# Altium PCB PCB.PcbDoc
Units mm, origin at the board's own origin, x right, y up, seen from the top; angles counter-clockwise.
Board outline 92.3 x 87.6 mm, 2 copper layers (Top Layer, Bottom Layer); 48 components, 51 nets, 200 pads, 325 vias.
Unrouted connection lines stored in the file: 1.
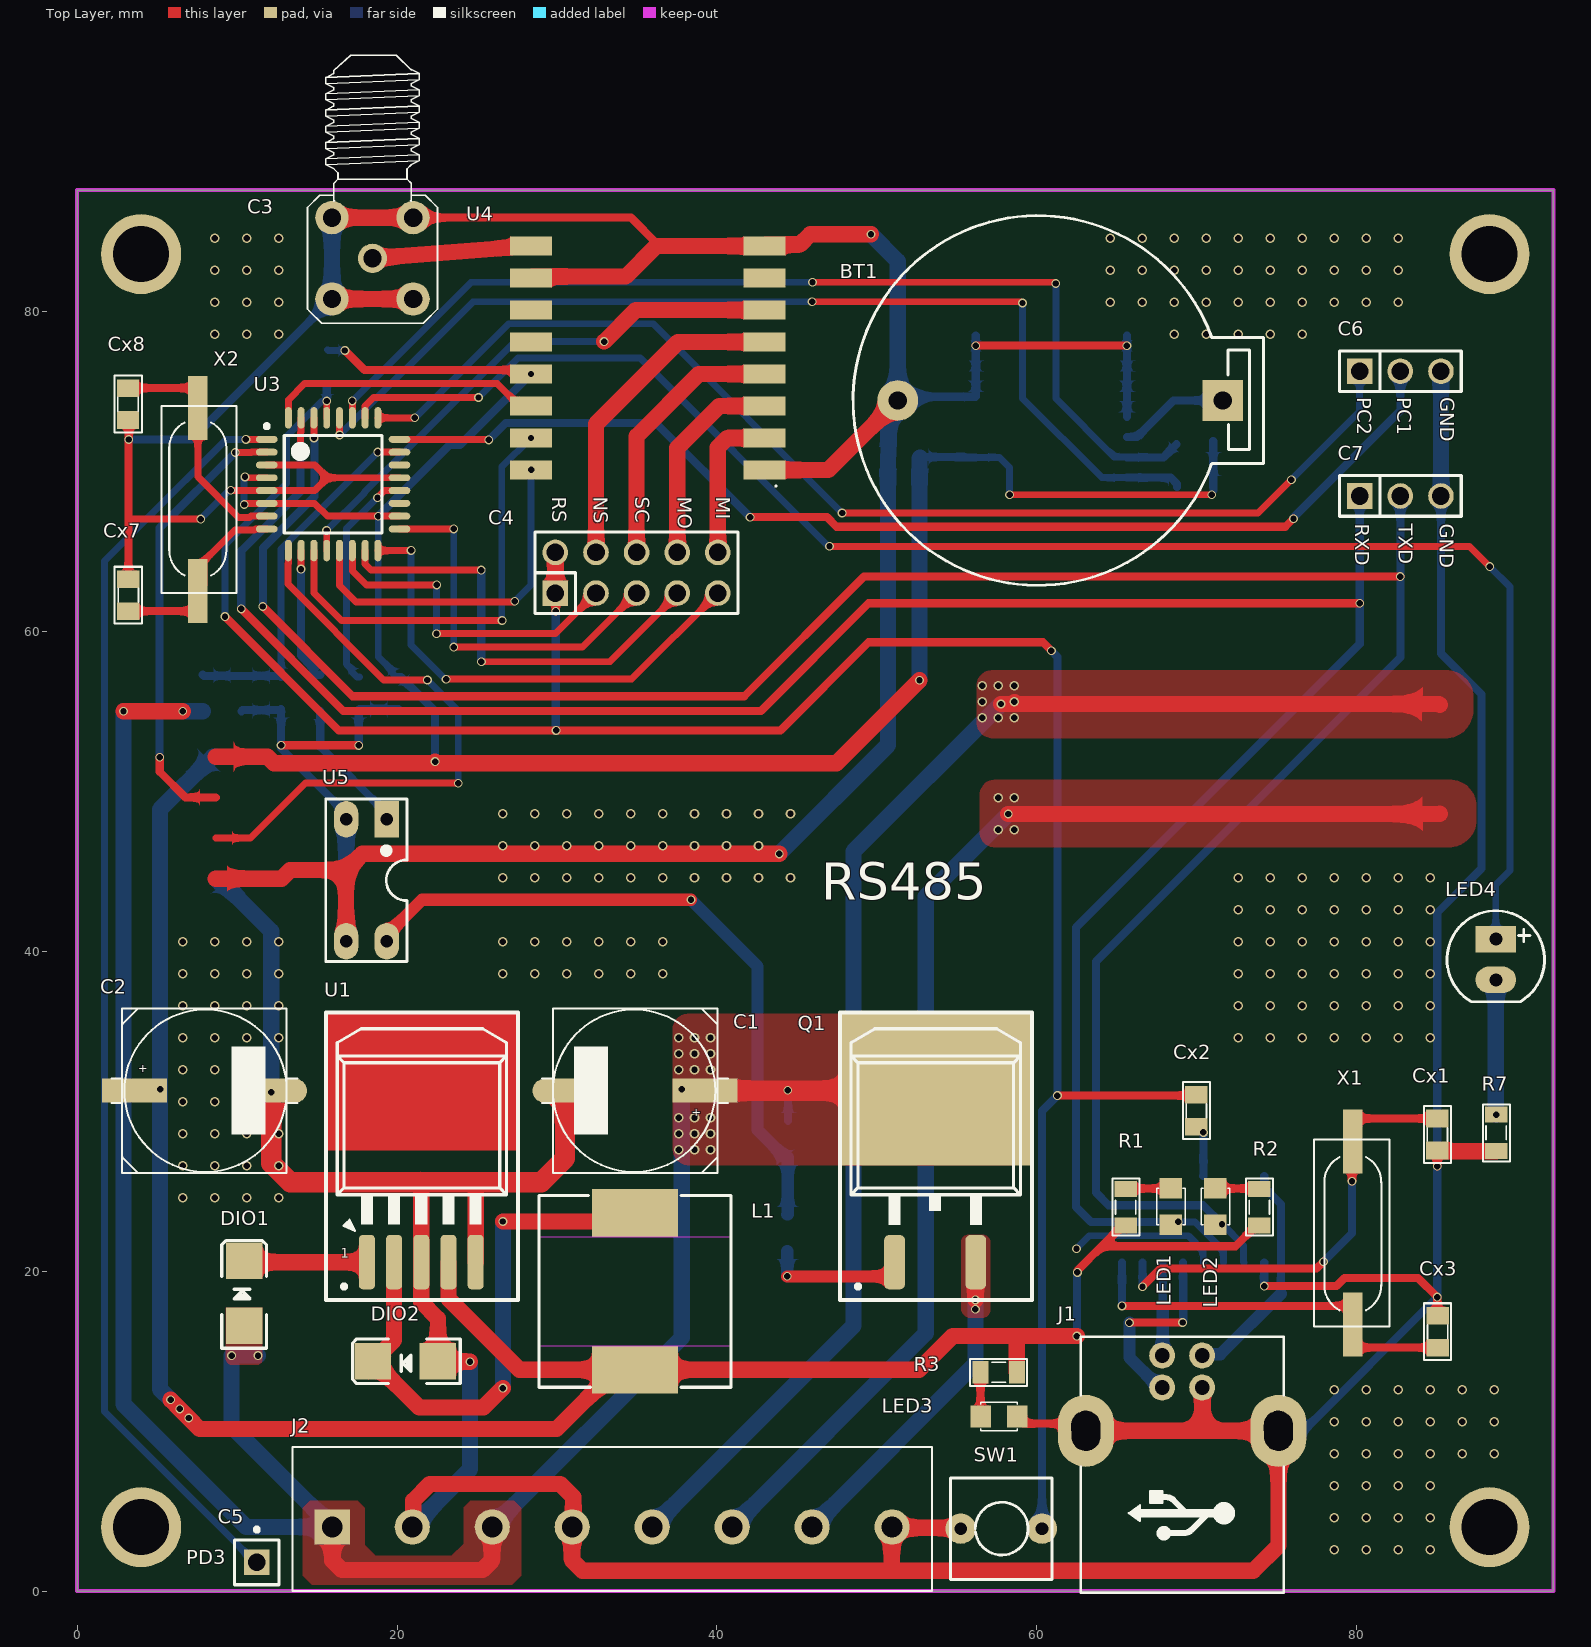
[diagram p0: Top Layer view]
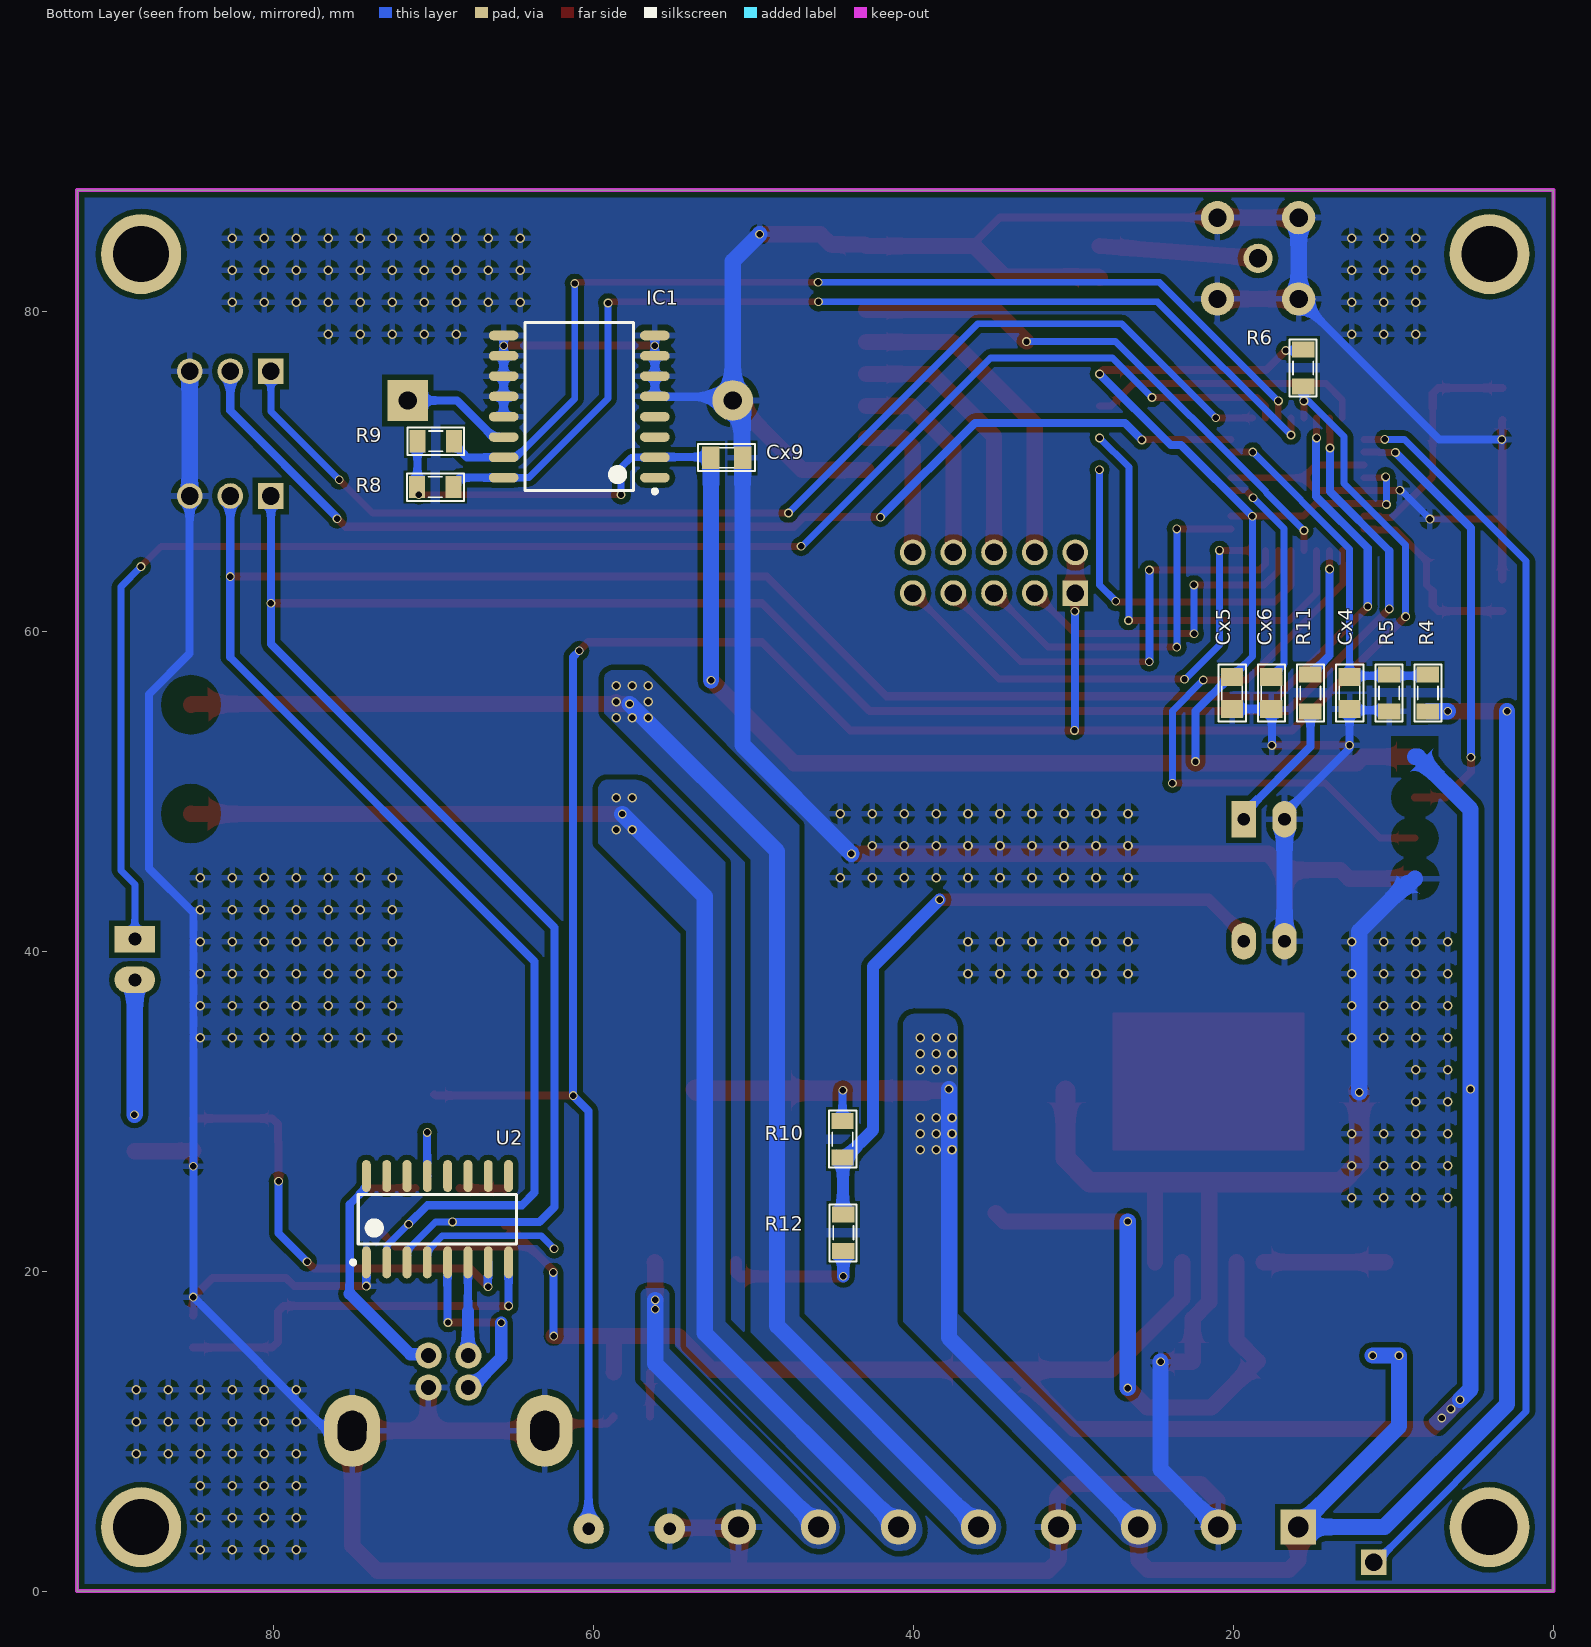
[diagram p1: Bottom Layer view, seen from below]

## Layer stack, top to bottom
Top Solder: solder mask 0.0102, Solder Resist, Dk 3.5
Top Layer: signal copper 0.0356
Dielectric 1: dielectric 0.32, FR-4, Dk 4.8
Bottom Layer: signal copper 0.0356
Bottom Solder: solder mask 0.0102, Solder Resist, Dk 3.5

## Board outline
0,0 92.3,0 92.3,87.6 0,87.6

## Design rules (kind name [scope] priority, off if disabled: settings)
Clearance [All] p1: gap=0.33 ignorepadtopadclearanceinfootprint=FALSE
PolygonConnect PolygonConnect_1 [InNet('GND')] p1: connectstyle=Relief reliefconductorwidth=0.381 reliefentries=4 polygonreliefangle="90 Angle" airgapwidth=0.381
PolygonConnect [All] p2: connectstyle=Direct reliefconductorwidth=0.381 reliefentries=4 polygonreliefangle="90 Angle" airgapwidth=0.381
RoutingVias [All] p1: holewidth=0.4 width=0.55 viastyle="Through Hole" minholewidth=0.4 minwidth=0.55 maxholewidth=0.4 maxwidth=0.55
SolderMaskExpansion [All] p1: expansion=0.102 istentingtop=FALSE
Width [All] p1: maxlimit=1.016 minlimit=0.432 preferedwidth=0.508
30 further rules are at their usual default settings.

## Components (designator, comment, footprint, x,y, rotation, side; value= is the part's Value field where it differs from the comment)
BT1 "PIN 3V" PIN3V 71.628,74.447 r180 top
C1 "CN-ALU-SMD" CAP-ALU-SMD-G 34.823,31.293 r180 top
C2 "CN-ALU-SMD" CAP-ALU-SMD-G 8.026,31.293 r0 top
C3 "210111003" SMA-RA 18.466,83.337 r180 top
C4 "JP5x2" JP5-D2T 34.976,63.678 r0 top
C5 "JP1" JP1-D1T 11.227,1.803 r0 top
C6 "JP3" JP3-D1T 80.188,76.276 r0 top
C7 "JP3" JP3-D1T 80.188,68.478 r0 top
Cx1 "XXpF" CN-SMD-0805 85.039,28.556 r90 top value=33pF
Cx2 "XXpF" CN-SMD-0805 69.977,30.048 r90 top value=33pF
Cx3 "XXpF" CN-SMD-0805 85.065,16.226 r270 top value=33pF
Cx4 "XXpF" CN-SMD-0805 12.746,56.159 r90 bottom value=33pF
Cx5 "XXpF" CN-SMD-0805 20.091,56.159 r90 bottom value=33pF
Cx6 "XXpF" CN-SMD-0805 17.643,56.159 r90 bottom value=33pF
Cx7 "XXpF" CN-SMD-0805 3.201,62.275 r270 top value=33pF
Cx8 "XXpF" CN-SMD-0805 3.175,74.225 r90 top value=33pF
Cx9 "XXpF" CN-SMD-0805 51.698,70.866 r0 bottom value=33pF
DIO1 "Diode SMD" DIO-SMD-106 10.439,18.618 r270 top value=1N5007
DIO2 "Diode SMD" DIO-SMD-106 20.523,14.376 r0 top value=1N5007
IC1 "DS3231" DS3231 60.909,74.066 r0 bottom
J1 "8492121" USB-C2 68.834,9.296 r180 top
J2 "KF8" KF8-5 33.452,4.013 r0 top
L1 "1.0 μH" L-SMD-M-12x10 34.874,18.745 r0 top
LED1 "LED" LED-0805-Orange 68.381,25.197 r270 top value="LED 3 - 5 ly 2 Colour"
LED2 "LED" LED-0805-Green 71.167,25.197 r270 top value="LED 3 - 5 ly 2 Colour"
LED3 "LED" LED-0805-Green 56.49,10.922 r0 top value="LED 3 - 5 ly 2 Colour"
LED4 "LED" LED-5-Yellow 88.697,40.767 r270 top value="LED 3 ly Single Colour"
Q1 "IRF5305" IRF5305 53.645,20.574 r0 top
R1 "Res" RES-SMD-0805 65.557,24.016 r90 top
R2 "Res" RES-SMD-0805 73.914,24.016 r90 top
R3 "Res" RES-SMD-0805 57.607,13.691 r0 top
R4 "Res" RES-SMD-0805 7.849,56.159 r90 bottom
R5 "Res" RES-SMD-0805 10.272,56.159 r270 bottom
R6 "Res" RES-SMD-0805 15.646,76.479 r270 bottom
R7 "Res" RES-SMD-0805 88.722,28.651 r90 top
R8 "Res" RES-SMD-0805 69.901,69.037 r180 bottom
R9 "Res" RES-SMD-0805 69.88,71.907 r180 bottom
R10 "Res" RES-SMD-0805 44.45,28.27 r90 bottom
R11 "Res" RES-SMD-0805 15.194,56.159 r90 bottom
R12 "Res" RES-SMD-0805 44.399,22.403 r270 bottom
SW1 "RST" SW2 60.325,3.912 r180 top value="SW chip 2 pin"
U1 "LM2976" TO263 21.133,26.543 r0 top
U2 "CH340G" SO16 69.774,23.259 r90 bottom
U3 "ATmega328-AU" TQFP32 16.002,69.215 r0 top
U4 "SW96" RFM96 44.435,85.36 r180 top
U5 "PC817" DIP4 19.355,48.26 r180 top
X1 "20Mhz" XTAL-RU49/4 79.756,17.438 r90 top value=4Mhz
X2 "20Mhz" XTAL-RU49/4 7.544,73.203 r270 top value=4Mhz

## Footprints (in the part's own frame and the unit in brackets; to place one, negate y for a bottom-side part, rotate by r counter-clockwise, add the part's x,y. Pads: shape width x height; smd on the part's side, far side on the other; paste and mask are expansions set on the pad)
CAP-ALU-SMD-G [mil]
  rect 160x59.06 smd: 1(-175,0)
  oval 160x59.06 smd: 2(170,0)
  silkscreen extent -231,-203 226,203, body extent -233,-203 223,203, height 402
CN-SMD-0805 [mm]
  rect 1.1x1.397 smd: 1(-1,0) 2(1,0)
  silkscreen extent -1.78,-0.86 1.78,0.84, body extent -1,-0.62 1,0.63, height 0.8
DIO-SMD-106 [mil]
  rect 90x90.55 smd: 1(80,0) 2(-80,0)
  silkscreen extent -130,-55 135,55, body extent -99,-50 106,52, height 95
DIP4 [mil]
  rect 60x90 hole 31: 1(0,0)
  oval 60x90 hole 31: 2(100,0) 3(100,300) 4(0,300)
  silkscreen extent -50,-50 150,350, body extent -59,-10 159,305, height 170
DS3231 [mm]
  oval 1.85x0.6 smd: 1(-4.725,4.445) 2(-4.725,3.175) 3(-4.725,1.905) 4(-4.725,0.635) 5(-4.725,-0.635) 6(-4.725,-1.905) 7(-4.725,-3.175) 8(-4.725,-4.445) 9(4.725,-4.445) 10(4.725,-3.175) 11(4.725,-1.905) 12(4.725,-0.635) 13(4.725,0.635) 14(4.725,1.905) 15(4.725,3.175) 16(4.725,4.445)
  silkscreen extent -4.85,-5.25 3.4,5.42, body extent -5.17,-5.25 5.17,5.25, height 2.5
IRF5305 [mm]
  rrect50% 1.3x3.4 smd: 1(-2.54,0) 2(2.54,0)
  rect 12x9.5 smd: 3(0,10.795)
  silkscreen extent -5.95,-2.38 6.05,15.62, body extent -5,-0.94 5,14.73, height 4.88
JP1-D1T [mm] "1pins, 1 row, straight, gold plating"
  rect 1.6x1.6 hole 1.1: 1(0,0)
  silkscreen extent -1.4,-1.4 1.4,2.17, body extent -1.27,-1.27 1.27,1.27, height 8.54
JP3-D1T [mm] "3 pins, 1 row, straight, gold plating"
  rect 1.6x1.6 hole 1.1: 1(0,0)
  round 1.6 hole 1.1: 2(2.54,0) 3(5.08,0)
  silkscreen extent -1.27,-1.27 6.35,1.27, body extent -1.27,-1.27 6.35,1.27, height 8.54
JP5-D2T [mm] "10 pins, dual pin, straight, gold plating"
  rect 1.6x1.6 hole 1.1: 1(-5.08,-1.27)
  round 1.6 hole 1.1: 2(-2.54,-1.27) 3(0,-1.27) 4(2.54,-1.27) 5(5.08,-1.27) 6(5.08,1.27) 7(2.54,1.27) 8(0,1.27) 9(-2.54,1.27) 10(-5.08,1.27)
  silkscreen extent -6.35,-2.54 6.35,2.54, body extent -6.35,-2.54 6.35,2.54, height 8.55
KF8-5 [mm] "Serie 1337 - 5.00 mm_8 pins"
  rect 2.2x2.2 hole 1.3: 1(-17.5,0)
  round 2.2 hole 1.3: 2(-12.5,0) 3(-7.5,0) 4(-2.5,0) 5(2.5,0) 6(7.5,0) 7(12.5,0) 8(17.5,0)
  silkscreen extent -20,-4 20,5, body extent -20,-4 20,5, height 13
L-SMD-M-12x10 [mm] "WE-PDA SMD Shielded Power Inductor, 1210"
  rect 5.4x3 smd: 1(0,4.9) 2(0,-4.9)
  Top Layer keep-out region: -6,-3.4 6,-3.4 6,3.4 -6,3.4
  silkscreen extent -6,-6 6,6, body extent -6,-6 6,6, height 9.7
LED-5-Yellow [mil] "LED 2 PIN, 5 ly , Only colour,pin to pin 100mil"
  rect 65x100 hole 32: 1(0,0)
  oval 65x100 hole 32: 2(100,0)
  silkscreen extent -70,-120 154,120, body extent -67,-122 147,115, height 339
LED-0805-Green [mil]
  rect 50x55 smd: 1(0,0) 2(90,0)
  silkscreen extent 0,-35 90,35, body extent 5,-25 85,25, height 43
LED-0805-Orange [mil]
  rect 50x55 smd: 1(0,0) 2(90,0)
  silkscreen extent 0,-35 90,35, body extent 5,-25 85,25, height 43
PIN3V [mil]
  rect 100x100 hole 45: 1(0,0)
  round 100 hole 45: 2(800,0)
  silkscreen extent -100,-455 910,455, body extent -128,-447 1002,449, height 278
RES-SMD-0805 [mil]
  rect 39.37x55 smd: 1(-45,0) 2(45,0)
  silkscreen extent -70,-34 70,33, body extent -39,-25 39,25, height 31
RFM96 [mm] "U?"
  rect 2.6x1.2 smd: 1(1.463,15.255) 2(1.463,13.255) 3(1.463,11.255) 4(1.463,9.255) 5(1.463,7.255) 6(1.463,5.255) 7(1.463,3.255) 8(1.463,1.255) 9(16.063,1.255) 10(16.063,3.255) 11(16.063,5.255) 12(16.063,7.255) 13(16.063,9.255) 14(16.063,11.255) 15(16.063,13.255) 16(16.063,15.255)
  silkscreen extent 0.7,16.22 0.8,16.32, body extent 0.76,0.31 16.76,16.21, height 2.19
SMA-RA [mil]
  round 72 hole 45: 1(0,0)
  round 82 hole 45: 2(-100,-100) 3(100,-100) 4(100,100) 5(-100,100)
  silkscreen extent -160,-500 160,160, body extent -137,-457 139,137, height 394
SO16 [mm] "SOIC, 16-Leads, Body 9.90x3.91mm, Pitch 1.27mm, IPC Medium Density"
  oval 2x0.55 smd: 1(-2.7,4.445) 2(-2.7,3.175) 3(-2.7,1.905) 4(-2.7,0.635) 5(-2.7,-0.635) 6(-2.7,-1.905) 7(-2.7,-3.175) 8(-2.7,-4.445) 9(2.7,-4.445) 10(2.7,-3.175) 11(2.7,-1.905) 12(2.7,-0.635) 13(2.7,0.635) 14(2.7,1.905) 15(2.7,3.175) 16(2.7,4.445)
  silkscreen extent -2.82,-4.95 1.55,5.4, body extent -3,-4.95 3,4.95, height 1.4
SW2 [mil]
  round 75 hole 31: 1(0,0) 2(200,0)
  silkscreen extent -25,-125 225,125
TO263 [mm]
  rrect50% 1x3.4 smd: 1(-3.019,-5.969) 2(-1.319,-5.969) 4(2.081,-5.969) 5(3.781,-5.969)
  rrect50% 1x3.4 smd mask+0: 3(0.381,-5.969)
  Top Layer region: -5.568,1.016 6.432,1.016 6.432,9.65 -5.568,9.65
  silkscreen extent -5.57,-8.35 6.43,9.65, body extent -4.73,-6.84 5.43,7.8, height 4.57
TQFP32 [mm] "Thin QFP, 32-Leads, Body 9x9mm, Pitch 0.8mm, IPC Low Density"
  oval 1.35x0.432 smd: 1(-4.15,2.8) 2(-4.15,2) 3(-4.15,1.2) 4(-4.15,0.4) 5(-4.15,-0.4) 6(-4.15,-1.2) 7(-4.15,-2) 8(-4.15,-2.8) 17(4.15,-2.8) 18(4.15,-2) 19(4.15,-1.2) 20(4.15,-0.4) 21(4.15,0.4) 22(4.15,1.2) 23(4.15,2) 24(4.15,2.8)
  oval 0.432x1.35 smd: 9(-2.8,-4.15) 10(-2,-4.15) 11(-1.2,-4.15) 12(-0.4,-4.15) 13(0.4,-4.15) 14(1.2,-4.15) 15(2,-4.15) 16(2.8,-4.15) 25(2.8,4.15) 26(2,4.15) 27(1.2,4.15) 28(0.4,4.15) 29(-0.4,4.15) 30(-1.2,4.15) 31(-2,4.15) 32(-2.8,4.15)
  silkscreen extent -4.27,-3.05 3.05,3.75, body extent -4.5,-4.5 4.5,4.5, height 1.4
USB-C2 [mil]
  round 64 hole 36 mask+1: 1(-59.21,-214.16) 2(39.21,-214.16) 3(39.21,-135.42) 4(-59.21,-135.42)
  oval 137.8x177.17 hole 70.87 slot 98.43 at 91 deg mask+0: 4(-247.01,-28.72) 4(227.01,-28.72)
  silkscreen extent -260,-260 240,370, body extent -293,-242 273,376, height 453
XTAL-RU49/4 [mm]
  rect 4x1.2 smd: 1(-0.762,0) 2(10.668,0)
  silkscreen extent -0.89,-2.29 10.79,2.41, body extent -1.2,-2.22 11.1,2.48, height 4.3

## Part data
BT1: "Battery 3VDC"
C1 C2: "Polarized Capacitor (Axial)", LatestRevisionDate=17-Jul-2002, LatestRevisionNote="Re-released for DXP Platform.", PackageReference=POLAR0.8, Published=8-Jun-2000, Publisher="Altium Limited"
C3: library part "CON Ant", "CONNECTOR ANTEN", Manufacturer="Würth Elektronik eiSos GmbH", ComponentLink1Description=Manufacturer, ComponentLink1URL=http://www.we-online.de, ComponentLink2Description=Datasheet, ComponentLink2URL=http://katalog.we-online.de/kataloge/eisos/index.php?language=en&pf=Filter_gerade, Created by="Christin Zierenner", Created Date="May 2012", partNo=210111003
C4: "WR-PHD 2.54 mm Dual Socket Header", Manufacturer="W¨¹rth Elektronik eiSos GmbH", partNo=61301021821, ComponentLink1 Description=Manufacturer, ComponentLink1URL=http://www.we-online.com, ComponentLink2 Description=Datasheet, ComponentLink2URL=http://katalog.we-online.de/em/datasheet/6130xx21821.pdf, Created by="Karrer Zheng", Created Date="29 March 2013", NoPins=10
C5: "WR-PHD 2.54 mm Angled Socket Header", Manufacturer="W¨¹rth Elektronik eiSos GmbH", partNo=613002143121, ComponentLink1 Description=Manufacturer, ComponentLink1URL=http://www.we-online.com, ComponentLink2 Description=Datasheet, ComponentLink2URL=http://katalog.we-online.de/em/datasheet/6130xx143121.pdf, Created by="Karrer Zheng", Created Date="29 March 2013", NoPins=02
C6 C7: "WR-PHD 2.54 mm Angled Socket Header", Manufacturer="W¨¹rth Elektronik eiSos GmbH", partNo=613003143121, ComponentLink1 Description=Manufacturer, ComponentLink1URL=http://www.we-online.com, ComponentLink2 Description=Datasheet, ComponentLink2URL=http://katalog.we-online.de/em/datasheet/6130xx143121.pdf, Created by="Karrer Zheng", Created Date="29 March 2013", NoPins=03
Cx1 Cx2 Cx3 Cx4 Cx5 Cx6 Cx7 Cx8 Cx9: library part CN
DIO1 DIO2: "Default Diode", Code - JEDEC=DO-214-AB, Published=8-Jun-2000, Publisher="Altium Limited", Revision="July-2002: Re-released for DXP Platform."
J1: library part USB-4, "THT USB 2.0 A Connector WE-EPLE", Manufacturer="Würth Elektronik eiSos GmbH", ComponentLink1Description=Manufacturer, ComponentLink1URL=http://www.we-online.de, ComponentLink2Description=Datasheet, ComponentLink2URL=http://www.we-online.de/katalog/media/pdf/8492121.pdf, Created by="Christin Otto", Created Date=OCT-2014, partNo=8492121
J2: Manufacturer="W¨¹rth Elektronik eiSos GmbH", partNo=691133710008, ComponentLink1 Description=Manufacturer, ComponentLink1 URL=http://www.we-online.com, ComponentLink2 Description=Datasheet, ComponentLink2 URL=http://katalog.we-online.de/em/datasheet/6911337100xx.pdf, Created by="Baojun Chen", Created Date=4-Aug-15, NoPins=8
L1: library part L-SMD-1, Manufacturer="Wurth Elektronik", partNo=78477010, ComponentLink1Description=Manufacturer, ComponentLink1URL=http://www.we-online.de, ComponentLink2Description=Datasheet, ComponentLink2URL=http://katalog.we-online.de/pbs/datasheet/78477010.pdf, Created by="Baojun Chen", Created Date=Nov.2015, Inductance="1.0 μH"
LED1 LED2 LED3: library part "LED SMD"
LED4: "LED Single colour Green and Red"
R1 R2 R3 R4 R5 R6 R7 R8 R9 R10 R11 R12: library part Res-SMD, "Resistor", Manufacturer="Generic Components", Class=Passive, Published=08/06/2000, Publisher="Altium Hobart Technology Centre"
SW1: library part SW2, "Switch button 2 pin"
U1: library part LM2596, Max Input Voltage="12 V", Max Output Current="3 (6.0 peak) A", Max Output Voltage=mV, Temperature Range="-40 to +125 degC", Category=IC-Power, Min Input Voltage=mV, Min Output Voltage=mV, Mounting Technology="Surface Mount", Status=Unreleased, Supply Voltage=mV
U2: "High and Low Side Driver", ComponentLink1Description="Manufacturer Link", ComponentLink1URL=http://www.irf.com/, ComponentLink2Description=Datasheet, ComponentLink2URL=http://www.irf.com/product-info/datasheets/data/ir2110.pdf, DatasheetVersion=PD60147J, LatestRevisionDate=04-Mar-2005, LatestRevisionNote="Stylized 3D Model Added.", Note="Pins 4, 8 and 14 are not connected", PackageDescription="DIP; 14 Leads; Row Spacing 7.62 mm; Pitch 2.54 mm", PackageReference=PDIP14, Published=8-Jun-2000, Publisher="Altium Limited"
U3: "8-bit AVR Microcontroller, 32KB Flash, 1KB EEPROM, 2KB SRAM, 32-pin TQFP, Industrial Grade (-40°C to 85°C)", Supplier Part Number 1=ATMEGA328-AU-ND, Code_JEDEC=MS-026-ABA, ComponentLink1Description="Manufacturer Link", ComponentLink1URL=http://www.atmel.com/products/avr/default.asp?, ComponentLink2Description="ATmega48A/48PA/88A/88PA/168A/168PA/328/328P Datasheet", ComponentLink2URL=http://www.atmel.com/dyn/resources/prod_documents/8271.pdf, ComponentLink3Description="ATmega48A/48PA/88A/88PA/168A/168PA/328/328P Summary", ComponentLink3URL=http://www.atmel.com/dyn/resources/prod_documents/8271S.pdf, ComponentLink4Description="Atmel.com Home", ComponentLink4URL=http://www.atmel.com, DatasheetVersion="revA, Jan-2010", PackageDescription="32-Lead, 7x7x1.0 mm Body, 0.8mm Lead Pitch, Thin Profile Plastic Quad Flat Package (TQFP)", PackageReference=32A, PackageVersion="revB, Oct-2001", Published=1-Apr-2010, Publisher="Altium Limited", Supplier 1=Digi-Key, Supplier 2=Mouser, Supplier Part Number 2=556-ATMEGA328-AU
U5: "Single Opto"
X1 X2: library part XT2, "Crystal, 32.768 KHz, -40 to 85 degC, 3.2 x 1.5 x 0.9 mm SMD"

## Free pads (board coordinates)
  round 5 hole 3.5: 1(4,83.6) 2(88.3,83.6) 3(88.3,4) 4(4,4)

## Via types
v1: diameter 0.6/0.6 (per signal layer), hole 0.4, Top Layer to Bottom Layer, 192 vias
v2: diameter 0.55, hole 0.4, Top Layer to Bottom Layer, 103 vias
v3: diameter 0.6, hole 0.4, Top Layer to Bottom Layer, 30 vias

## Nets (pads, with @x,y where several pads share a name; then routed paths per layer and width w, separated by ;. In a path a pad name is that pad's centre, name@x,y a point inside that pad or via, vN(x,y) a via of type N, cw(c..) or ccw(c..) an arc to the next point about the centre after c; other vN are vias at no path point)
+3.3V: C2.1 Cx5.2 Cx9.2 IC1.2 L1.2 R1.1 R2.1 R3.2 R6.1 R8.1 R9.1 U1.4 U3.4 U3.6 U3.18 U4.13 | length 277.8
  Top Layer w0.432: v2(10.439,67.945) 10.471,67.945 10.541,68.015 14.84,68.015 15.64,67.215 v2(18.821,67.215) U3.18 ; v2(10.49,69.672) 10.522,69.672 10.579,69.615 U3.4 ; v2(58.296,68.549) 58.302,68.555 v2(70.942,68.555)
  Top Layer w0.508: v2(16.739,77.572) 17.958,76.352 28.124,76.352 v2(28.372,76.105) U4.13@28.397,76.13 ; v2(62.535,19.93) 62.535,20.049 64.051,21.565 ; R1.1 65.359,22.873 64.051,21.565 ; R2.1 73.715,22.873 73.469,22.627 73.469,22.619 72.415,21.565 64.051,21.565
  Top Layer w1.016: v2(5.842,11.963) v2(6.411,11.395) v2(6.979,10.826) 7.671,10.135 29.964,10.135 33.336,13.507 L1.2@33.336,13.845 ; 8.661,52.172 11.9,52.172 12.302,51.77 22.28,51.77 v2(22.377,51.867) ; v2@22.377,51.77 47.477,51.77 v2(52.664,56.956) ; U1.4 23.214,18.29 27.658,13.845 L1.2@33.336,13.845 ; R3.2 58.742,13.699 58.742,15.832 58.623,15.951 ; v2(62.509,15.951) 58.623,15.951 ; L1.2@33.336,13.845 L1.2 52.631,13.845 54.737,15.951 58.623,15.951
  Bottom Layer w0.432: v2(10.439,67.945) 10.439,69.589 10.49,69.64 v2(10.49,69.672) ; R6.1 15.697,77.572 v2(16.739,77.572) ; v2(18.821,67.215) 18.821,58.43 19.609,57.642 19.609,57.494 19.943,57.16 Cx5.2 ; IC1.2 57.658,70.891 58.293,70.256 58.293,68.552 v2(58.296,68.549)
  Bottom Layer w0.508: v2(18.821,67.215) 18.832,67.215 23.277,71.66 23.927,71.66 v2(28.372,76.105) ; Cx5.2 20.24,57.16 22.377,55.022 v2(22.377,51.867) ; Cx9.2 52.749,70.917 55.509,70.917 55.534,70.891 IC1.2 ; v2(62.509,15.951) 62.509,19.894 62.535,19.919 v2(62.535,19.93) ; R9.1 71.033,71.897 71.033,69.048 R8.1 R8.1@71.044,68.839
  Bottom Layer w1.016: v2(5.842,11.963) 5.182,12.624 v2(5.182,31.394) 5.182,48.882 8.471,52.172 8.661,52.172 ; v2(52.664,56.956) 52.664,70.831 Cx9.2
+12V: C1.1 DIO1.1 J2.1 J2.3 Q1.3 R4.1 R10.2 | length 146.3
  Top Layer w1.016: v2(2.896,55.016) v2(6.604,55.016) ; J2.1@15.418,4.496 15.444,4.521 J2.1 15.952,1.916 16.547,1.321 25.338,1.321 25.933,1.916 25.933,3.995 J2.3 ; v2(37.795,31.394) 37.897,31.293 C1.1
  Top Layer w1.27: C1.1 53.569,31.293 Q1.3
  Bottom Layer w0.508: v2(6.604,55.016) 6.629,55.042 6.655,55.016 R4.1 ; v2(44.425,31.318) 44.425,31.242 44.45,31.217 R10.2
  Bottom Layer w1.016: v2(2.896,55.016) 2.896,11.684 10.566,4.013 J2.1 9.652,10.313 v2(9.652,14.732) v2(11.303,14.732) ; v2(6.604,55.016) 6.655,55.016 R4.1 ; J2.3 37.795,15.857 v2(37.795,31.394)
  other v3: 37.6,27.6 38.6,27.6 39.6,27.6 37.6,28.6 38.6,28.6 39.6,28.6 37.6,29.6 38.6,29.6 39.6,29.6 37.6,32.6 38.6,32.6 39.6,32.6 37.6,33.6 38.6,33.6 39.6,33.6 37.6,34.6 38.6,34.6 39.6,34.6
A+: J2.5 | length 88.1
  Top Layer w1.016: v2(57.76,55.474) v3@58.6,55.474 ; v3(58.6,55.6) v3@58.6,55.474 ; 85.192,55.423 85.141,55.474 v3@58.6,55.474
  Bottom Layer w1.016: J2.5 48.539,16.601 48.539,46.253 v2(57.76,55.474)
  other v3: 56.6,54.6 57.6,54.6 58.6,54.6 56.6,55.6 56.6,56.6 57.6,56.6 58.6,56.6
AlarmLed: LED4.1 U3.26 | length 101.9
  Top Layer w0.432: U3.26 18.002,74.102 18.538,74.638 v2(25.095,74.638) ; v2(47.041,65.329) 87.046,65.329 v2(88.316,64.059)
  Bottom Layer w0.432: v2(25.095,74.638) 27.572,77.114 35.204,77.114 46.99,65.329 v2(47.041,65.329) ; v2(88.316,64.059) 89.573,62.801 89.573,45.06 88.697,44.183 LED4.1
B-: J2.6 | length 78.7
  Top Layer w1.016: v2(58.217,48.59) 85.166,48.59 85.192,48.616
  Bottom Layer w1.016: J2.6 53.061,16.122 53.061,43.434 v2(58.217,48.59)
  other v3: 57.6,47.6 58.6,47.6 57.6,49.6 58.6,49.6
CheckAcQ: Cx4.2 R4.2 R5.1 U3.23 | length 22.9
  Top Layer w0.432: v2(18.796,71.222) 18.803,71.215 U3.23
  Bottom Layer w0.432: Cx4.2 12.746,65.171 v2(18.796,71.222)
  Bottom Layer w0.508: R4.2 7.92,57.231 12.674,57.231 Cx4.2
DIO0: U3.32 U4.14 | length 17.3
  Top Layer w0.432: U3.32 13.202,74.492 14.224,75.514 26.263,75.514 27.672,74.105 U4.14
DIO1: U3.11 U4.15 | length 27.4
  Top Layer w0.432: U3.11 14.802,64.258 14.817,64.244 14.817,63.564 14.802,63.549 14.802,62.414 16.535,60.681 22.115,60.681 22.124,60.689 v2(26.568,60.689)
  Top Layer w0.508: v2(28.372,72.105) U4.15@28.397,72.13
  Bottom Layer w0.432: v2(26.568,60.689) 26.546,60.712 26.546,61.557 26.543,61.56 26.543,70.277 v2(28.372,72.105)
DIO2: U3.13 U4.16 | length 22.3
  Top Layer w0.432: U3.13 16.402,62.871 17.424,61.849 27.314,61.849 v2(27.364,61.9)
  Top Layer w0.508: U4.16 v2(28.384,70.118)
  Bottom Layer w0.432: v2(27.364,61.9) 28.384,62.92 v2(28.384,70.118)
GND: BT1.2 C1.2 C2.2 C3.2 C3.3 C3.4 C3.5 C6.3 C7.3 Cx1.1 Cx3.1 Cx4.1 Cx5.1 Cx6.1 Cx7.1 Cx8.1 Cx9.1 DIO2.1 IC1.5 IC1.6 IC1.7 IC1.8 IC1.9 IC1.10 IC1.11 IC1.12 IC1.13 J1.4 J2.2 J2.4 J2.8 LED3.2 R5.2 R7.1 SW1.2 U1.3 U1.5 U2.1 U3.3 U3.5 U3.21 U4.1 U4.8 U4.10 U5.2 U5.3 | length 508.4
  Top Layer w0.432: 3.201,67.056 3.226,67.031 v2(7.722,67.031) ; v2(9.601,68.834) 9.62,68.815 U3.5 14.853,68.815 15.653,69.615 ; U3.3 14.853,70.415 15.653,69.615 ; U3.21 15.653,69.615
  Top Layer w0.508: Cx7.1@3.175,63.3 Cx7.1 3.201,67.056 3.201,71.984 v2(3.226,72.009) 3.226,73.174 Cx8.1 ; v2(12.751,52.895) 12.757,52.889 17.596,52.889 v2(17.602,52.883) ; C3.2 34.62,85.877 36.253,84.245 ; v2(56.184,77.876) v2(65.634,77.876) ; LED3.2 58.776,10.858 59.157,10.477 62.616,10.477 J1.4@63.068,10.026 ; v2(74.219,19.075) 78.729,19.075 79.237,19.583 83.845,19.583 v2(85.039,18.39) 85.039,17.251 Cx3.1 ; v2(85.039,26.568) Cx1.1
  Top Layer w1.016: 8.661,44.552 12.772,44.552 13.305,45.085 16.815,45.085 ; v2(12.141,31.187) 12.247,31.293 C2.2 ; C3.4 C3.5 ; C3.3 C3.2 ; U5.3 16.815,45.085 ; J2.2 21.006,4.067 21.006,5.664 22.047,6.706 30.201,6.706 31.013,5.893 31.013,4.075 J2.4 30.937,3.999 30.937,1.93 31.598,1.27 50.978,1.27 ; 21.438,25.578 21.514,25.502 21.514,18.086 22.555,17.045 DIO2.1 22.581,14.351 v2(24.562,14.351) ; U1.5 24.914,25.523 24.968,25.578 ; U4.10 28.461,82.194 34.29,82.194 36.201,84.105 U4.8 43.064,84.197 45.193,84.197 45.832,84.836 v2(49.632,84.836) ; U4.1 46.966,70.105 BT1.2 ; v2(43.891,46.101) 42.6,46.101 40.6,46.101 38.6,46.101 36.6,46.101 34.6,46.101 32.6,46.101 30.6,46.101 28.6,46.101 26.6,46.101 17.831,46.101 16.815,45.085 ; SW1.2 55.194,3.962 51.003,3.962 J2.8 50.927,3.988 50.927,1.321 50.978,1.27 ; J1.4@63.068,10.026 70.358,10.026 ; J1.4@70.338,12.736 70.358,12.716 70.358,10.026 ; Cx1.1 85.188,27.556 85.235,27.508 R7.1 ; 50.978,1.27 73.533,1.27 75.108,2.845 75.108,10.026 70.358,10.026
  Top Layer w1.27: v2(12.141,31.187) 12.141,26.746 13.31,25.578 21.438,25.578 24.968,25.578 29.007,25.578 30.505,27.076 C1.2
  Bottom Layer w0.432: v2(7.722,67.031) 9.502,68.811 9.579,68.811 v2(9.601,68.834)
  Bottom Layer w0.508: R5.2 10.343,55.088 12.674,55.088 Cx4.1 12.675,55.088 12.776,54.987 12.751,54.961 v2(12.751,52.895) 12.751,52.705 16.815,48.641 U5.2 ; C3.4 7.137,72.009 v2(3.226,72.009) ; v2(17.602,52.883) 17.602,55.119 Cx6.1 Cx5.1 ; Cx9.1 Cx9.1@50.698,71.014 ; BT1.2 51.544,74.684 56.167,74.684 IC1.5 IC1.6 IC1.7 v2(56.184,77.876) IC1.8 ; IC1.13 IC1.12 IC1.11 IC1.10 v2(65.634,77.876) IC1.9 ; J1.4@70.333,12.731 J1.4@70.338,12.736 ; v2(74.219,19.075) U2.1 ; J1.4@75.108,10.026 76.676,10.026 v2(85.039,18.39) v2(85.039,26.568) 85.039,42.418 87.808,45.187 87.808,56.083 85.268,58.623 C7.3 ; v2(3.226,72.009) 3.175,71.958 v2(3.226,72.009)
  Bottom Layer w1.016: 8.661,44.552 8.952,44.261 9.142,44.261 12.141,41.262 12.141,40.6 12.141,38.6 12.141,36.6 12.141,34.6 v2(12.141,31.187) ; C3.4 C3.3 ; U5.3 U5.2 ; J2.2 24.562,7.623 v2(24.562,14.351) ; v2(43.891,46.101) 50.698,52.908 Cx9.1 ; v2(49.632,84.836) 51.308,83.16 BT1.2 51.308,74.035 50.724,73.451 50.724,71.04 Cx9.1@50.698,71.014 ; C7.3 C6.3
  other v1: 78.6,2.6 80.6,2.6 82.6,2.6 84.6,2.6 78.6,4.6 80.6,4.6 82.6,4.6 84.6,4.6 78.6,6.6 80.6,6.6 82.6,6.6 84.6,6.6 78.6,8.6 80.6,8.6 82.6,8.6 84.6,8.6 86.6,8.6 88.6,8.6 78.6,10.6 80.6,10.6 82.6,10.6 84.6,10.6 86.6,10.6 88.6,10.6 78.6,12.6 80.6,12.6 82.6,12.6 84.6,12.6 86.6,12.6 88.6,12.6 6.6,24.6 8.6,24.6 10.6,24.6 12.6,24.6 6.6,26.6 8.6,26.6 10.6,26.6 12.6,26.6 6.6,28.6 8.6,28.6 10.6,28.6 12.6,28.6 6.6,30.6 8.6,30.6 6.6,32.6 8.6,32.6 6.6,34.6 8.6,34.6 10.6,34.6 12.6,34.6 72.6,34.6 74.6,34.6 76.6,34.6 78.6,34.6 80.6,34.6 82.6,34.6 84.6,34.6 6.6,36.6 8.6,36.6 10.6,36.6 12.6,36.6 72.6,36.6 74.6,36.6 76.6,36.6 78.6,36.6 80.6,36.6 82.6,36.6 84.6,36.6 6.6,38.6 8.6,38.6 10.6,38.6 12.6,38.6 26.6,38.6 28.6,38.6 30.6,38.6 32.6,38.6 34.6,38.6 36.6,38.6 72.6,38.6 74.6,38.6 76.6,38.6 78.6,38.6 80.6,38.6 82.6,38.6 84.6,38.6 6.6,40.6 8.6,40.6 10.6,40.6 12.6,40.6 26.6,40.6 28.6,40.6 30.6,40.6 32.6,40.6 34.6,40.6 36.6,40.6 72.6,40.6 74.6,40.6 76.6,40.6 78.6,40.6 80.6,40.6 82.6,40.6 84.6,40.6 72.6,42.6 74.6,42.6 76.6,42.6 78.6,42.6 80.6,42.6 82.6,42.6 84.6,42.6 26.6,44.6 28.6,44.6 30.6,44.6 32.6,44.6 34.6,44.6 36.6,44.6 38.6,44.6 40.6,44.6 42.6,44.6 44.6,44.6 72.6,44.6 74.6,44.6 76.6,44.6 78.6,44.6 80.6,44.6 82.6,44.6 84.6,44.6 26.6,46.6 28.6,46.6 30.6,46.6 32.6,46.6 34.6,46.6 36.6,46.6 38.6,46.6 40.6,46.6 42.6,46.6 26.6,48.6 28.6,48.6 30.6,48.6 32.6,48.6 34.6,48.6 36.6,48.6 38.6,48.6 40.6,48.6 42.6,48.6 44.6,48.6 8.6,78.6 10.6,78.6 12.6,78.6 68.6,78.6 70.6,78.6 72.6,78.6 74.6,78.6 76.6,78.6 8.6,80.6 10.6,80.6 12.6,80.6 64.6,80.6 66.6,80.6 68.6,80.6 70.6,80.6 72.6,80.6 74.6,80.6 76.6,80.6 78.6,80.6 80.6,80.6 82.6,80.6 8.6,82.6 10.6,82.6 12.6,82.6 64.6,82.6 66.6,82.6 68.6,82.6 70.6,82.6 72.6,82.6 74.6,82.6 76.6,82.6 78.6,82.6 80.6,82.6 82.6,82.6 8.6,84.6 10.6,84.6 12.6,84.6 64.6,84.6 66.6,84.6 68.6,84.6 70.6,84.6 72.6,84.6 74.6,84.6 76.6,84.6 78.6,84.6 80.6,84.6 82.6,84.6
LED: R11.2 U3.10 | length 8.4
  Top Layer w0.432: v2(13.995,63.904) 14.002,63.91 U3.10
  Bottom Layer w0.508: v2(13.995,63.904) 13.995,58.501 14.75,57.747 14.75,57.548 14.996,57.302 R11.2
"LED OUT": J2.7 Q1.2 | length 20.8
  Top Layer w1.016: v2(56.159,18.212) 56.159,20.549 Q1.2
  Bottom Layer w1.016: J2.7 56.159,14.221 v2(56.159,17.628) v2(56.159,18.212)
MISO: C4.6 U4.2 | length 9.7
  Top Layer w1.016: C4.6 40.056,71.51 40.651,72.105 U4.2
MOSI: C4.7 U4.3 | length 13.1
  Top Layer w1.016: C4.7 37.516,71.473 40.148,74.105 U4.3
NetBT1_1: BT1.1 IC1.14 | length 6.9
  Bottom Layer w0.508: IC1.14 66.259,72.161 68.545,74.447 BT1.1
NetC3_1: C3.1 U4.9 | length 9.9
  Top Layer w1.016: C3.1 U4.9
NetC4_2: C4.2 U3.14 | length 21
  Top Layer w0.432: U3.14 17.202,63.799 18.085,62.916 v2(22.479,62.916) ; v2(22.464,59.868) 29.896,59.868 C4.2
  Bottom Layer w0.432: v2(22.464,59.868) 22.471,59.876 22.471,62.908 v2(22.479,62.916)
NetC4_3: C4.3 U3.17 | length 23.6
  Top Layer w0.432: U3.17 23.54,66.415 v2(23.546,66.421) ; v2(23.546,59.03) 31.598,59.03 C4.3
  Bottom Layer w0.432: v2(23.546,59.03) v2(23.546,66.421)
NetC4_4: C4.4 U3.15 | length 28.1
  Top Layer w0.432: U3.15 18.002,64.218 18.376,63.844 v2(25.261,63.844) ; v2(25.273,58.115) 33.325,58.115 37.516,62.306 C4.4
  Bottom Layer w0.508: v2(25.261,63.844) 25.261,58.127 v2(25.273,58.115)
NetC4_5: C4.5 U3.16 | length 30.3
  Top Layer w0.432: U3.16 20.844,65.065 20.853,65.075 v2(20.879,65.075) ; v2(23.063,57.023) 34.671,57.023 C4.5
  Bottom Layer w0.432: v2(20.879,65.075) 20.879,59.157 23.038,56.998 v2(23.063,57.023)
NetCx1_2: Cx1.2 U2.7 X1.2 | length 28.3
  Top Layer w0.508: v2(66.607,19.04) 67.734,20.168 77.495,20.168 v2(77.927,20.599) ; v2(79.705,25.629) 79.705,28.055 X1.2 79.756,29.21 80.102,29.556 Cx1.2
  Bottom Layer w0.508: U2.7 66.599,19.822 66.625,19.796 66.625,19.058 v2(66.607,19.04) ; v2(77.927,20.599) 79.705,22.377 v2(79.705,25.629)
NetCx2_1: Cx2.1 U2.13 | length 2.7
  Bottom Layer w0.508: U2.13 70.417,25.967 v2(70.417,28.685)
NetCx3_2: Cx3.2 U2.8 X1.1 | length 24.7
  Top Layer w0.508: v2(65.327,17.839) 79.41,17.839 79.756,17.493 79.756,15.572 80.102,15.226 Cx3.2
  Bottom Layer w0.508: v2(65.327,17.839) 65.327,20.557 U2.8
NetCx6_2: Cx6.2 U3.20 | length 14
  Top Layer w0.432: v2(18.775,68.373) 19.217,68.815 U3.20
  Bottom Layer w0.432: Cx6.2 17.495,57.16 17.16,57.494 17.16,57.642 16.84,57.962 16.84,66.438 v2(18.775,68.373)
NetCx7_2: Cx7.2 U3.8 X2.2 | length 12.2
  Top Layer w0.432: X2.2 7.928,62.919 7.928,64.417 9.872,66.362 11.095,66.362 11.148,66.415 U3.8
  Top Layer w0.508: Cx7.2 7.198,61.275 7.544,61.621 X2.2
NetCx8_2: Cx8.2 U3.7 X2.1 | length 15.1
  Top Layer w0.432: X2.1 7.544,69.679 10.099,67.124 10.78,67.124 10.871,67.215 U3.7
  Top Layer w0.508: Cx8.2 7.198,75.225 7.544,74.879 X2.1
NetDIO1_2: DIO1.2 U1.1 | length 7.7
  Top Layer w0.762: DIO1.2 DIO1.2@10.516,20.574
  Top Layer w1.016: DIO1.2@10.516,20.574 U1.1
NetDIO2_2: DIO2.2 L1.1 U1.2 | length 35.5
  Top Layer w1.016: U1.2 19.814,15.706 18.491,14.383 DIO2.2 18.491,14.369 21.38,11.481 25.4,11.481 v2(26.619,12.7) ; v2(26.619,23.114) 34.343,23.114 L1.1
  Bottom Layer w1.016: v2(26.619,12.7) v2(26.619,23.114)
NetJ1_1: J1.1 U2.16 | length 14.3
  Bottom Layer w0.508: J1.1 J1.1@70.411,14.809 ; U2.16 74.219,25.234 75.26,24.192 75.26,18.593
  Bottom Layer w0.762: J1.1@70.411,14.809 71.476,14.809 75.26,18.593
NetJ1_2: J1.2 U2.6 | length 5.8
  Bottom Layer w0.508: U2.6@67.861,20.551 U2.6 67.869,17.501
  Bottom Layer w0.762: J1.2@67.869,14.767 67.869,17.501
  Bottom Layer w1.016: J1.2 J1.2@67.869,14.767
NetJ1_3: J1.3 U2.5 | length 12.1
  Top Layer w0.508: v2(65.786,16.789) 65.796,16.8 v2(69.113,16.8)
  Bottom Layer w0.508: v2(69.113,16.8) 69.157,16.843 69.157,19.786 69.147,19.796 69.147,20.551 U2.5
  Bottom Layer w0.762: v2(65.786,16.789) 65.786,14.605 67.655,12.736 J1.3
NetLED1_1: LED1.1 R1.2 | length 2.8
  Top Layer w0.508: R1.2 65.576,25.178 68.362,25.178 LED1.1
NetLED2_1: LED2.1 R2.2 | length 2.8
  Top Layer w0.508: LED2.1 71.186,25.178 73.895,25.178 R2.2
NetLED3_1: LED3.1 R3.1 | length 2.8
  Top Layer w0.508: R3.1 56.477,13.678 56.477,10.935 LED3.1
NetLED4_2: LED4.2 R7.2 | length 8.4
  Bottom Layer w1.016: LED4.2 88.697,29.82 v2(88.722,29.794)
NetQ1_1: Q1.1 R12.2 | length 9
  Top Layer w0.762: v2(44.399,19.685) 50.836,19.685 51.105,19.954 Q1.1
  Bottom Layer w0.762: v2(44.399,19.685) R12.2
NetR10_1: R10.1 R12.1 U5.4 | length 42.7
  Top Layer w0.762: U5.4 19.355,41.021 21.565,43.231 v2(38.379,43.231)
  Bottom Layer w0.762: v2(38.379,43.231) 42.545,39.065 42.545,28.834 44.252,27.127 R10.1 44.425,27.102 44.425,23.571 R12.1
NetR11_1: R11.1 U5.1 | length 8.5
  Bottom Layer w0.508: R11.1 15.194,52.802 19.355,48.641 U5.1
NSS: C4.9 U4.5 | length 20.7
  Top Layer w1.016: C4.9 32.436,72.974 37.567,78.105 U4.5
PC1: C6.2 U3.24 | length 71.3
  Top Layer w0.432: U3.24 25.699,72.015 v2(25.73,71.984)
  Top Layer w0.508: v2(42.073,67.154) 46.871,67.154 47.472,66.552 75.533,66.552 76.036,67.056 v2(76.048,67.056)
  Bottom Layer w0.432: C6.2@82.715,76.276 C6.2
  Bottom Layer w0.508: v2(25.73,71.984) 26.797,73.05 36.176,73.05 v2(42.073,67.154) ; v2(76.048,67.056) 76.048,67.132 82.728,73.812 C6.2
PC2: C6.1 U3.25 | length 73.9
  Top Layer w0.432: U3.25 v2(21.107,73.365) ; v2(47.828,67.412) 73.838,67.412 v2(75.921,69.494)
  Bottom Layer w0.432: v2(21.107,73.365) 26.99,79.248 35.992,79.248 v2(47.828,67.412) ; v2@75.933,69.494 v2(75.921,69.494) 80.188,73.762 C6.1
PD3: C5.1 U3.1 | length 79.9
  Top Layer w0.432: v2(10.551,72.012) 10.614,72.012 10.617,72.009 10.623,72.015 U3.1
  Bottom Layer w0.432: v2(10.551,72.012) 10.544,72.019 9.321,72.019 4.115,66.813 1.702,64.4 1.702,11.227 10.541,2.388 10.643,2.388 C5.1
RESET: U3.12 U4.6 | length 34.4
  Top Layer w0.432: v2(15.596,66.319) 15.602,66.313 U3.12
  Top Layer w1.016: v2(32.944,78.13) 34.918,80.105 U4.6
  Bottom Layer w0.432: v2(15.596,66.319) 17.954,68.677 17.954,68.713 27.371,78.13 v2(32.944,78.13)
Reset328: C4.1 C4.10 Cx2.2 R6.2 SW1.1 U3.29 | length 150.7
  Top Layer w0.432: U3.29 v2(15.602,74.416)
  Top Layer w0.508: v2(9.243,60.935) 16.355,53.823 v2(29.947,53.823) 43.967,53.823 49.479,59.334 60.376,59.334 v2(60.909,58.801) ; C4.1 29.921,62.382 v2(29.921,61.265) ; v2(61.29,30.988) 69.885,30.988 69.961,31.064 Cx2.2
  Top Layer w1.016: C4.1 C4.10
  Bottom Layer w0.432: v2(9.243,60.935) 9.243,65.416 13.081,69.254 13.081,72.187 15.287,74.393 15.579,74.393 v2(15.602,74.416)
  Bottom Layer w0.508: v2(15.602,74.416) 15.602,75.292 R6.2 ; v2(29.921,61.265) 29.921,53.848 v2(29.947,53.823) ; SW1.1 60.325,30.023 v2(61.29,30.988) 61.29,58.42 v2(60.909,58.801)
RX1: U3.9 | length 37.2
  Top Layer w0.432: 8.661,47.092 10.846,47.092 14.275,50.521 v2(23.825,50.521) ; U3.9 13.202,64.272 13.174,64.244 13.174,62.964 19.166,56.972 v2(21.895,56.972)
  Bottom Layer w0.432: v2(21.895,56.972) 23.825,55.042 v2(23.825,50.521)
RXD: C7.1 LED1.2 U2.3 U3.31 | length 151.7
  Top Layer w0.432: v2(13.97,71.476) 13.97,72.434 14.002,72.466 U3.31
  Top Layer w0.508: v2(10.262,61.417) 16.637,55.042 42.757,55.042 49.488,61.773 v2(80.188,61.773)
  Bottom Layer w0.432: v2(68.834,23.089) 69.89,23.089 71.679,21.3 U2.3
  Bottom Layer w0.508: v2(10.262,61.417) 10.262,65.054 13.97,68.762 v2(13.97,71.476) ; v2(68.834,23.089) 63.398,23.089 62.459,24.028 62.459,41.504 80.188,59.233 v2(80.188,61.773) C7.1
SCK: C4.8 U4.4 | length 16.9
  Top Layer w1.016: C4.8 34.976,72.212 38.869,76.105 U4.4
SCL: IC1.16 R8.2 U3.28 | length 65.3
  Top Layer w0.432: U3.28 16.402,72.295 v2(16.408,72.288) ; v2(45.949,80.62) 58.998,80.62 59.074,80.543 v2(59.106,80.543)
  Bottom Layer w0.432: v2(16.408,72.288) 24.74,80.62 v2(45.949,80.62) ; v2(59.106,80.543) 59.106,74.577 64.062,69.621 IC1.16
  Bottom Layer w0.508: IC1.16 68.372,69.621 68.758,69.236 R8.2
SDA: IC1.15 R9.2 U3.27 | length 64.8
  Top Layer w0.432: v2(17.196,74.422) 17.202,74.416 U3.27 ; v2(45.974,81.839) 61.08,81.839 61.157,81.763 v2(61.189,81.763)
  Bottom Layer w0.432: v2(17.196,74.422) 17.206,74.422 24.622,81.839 v2(45.974,81.839) ; v2(61.189,81.763) 61.189,74.574 64.839,70.924 65.602,70.924 IC1.15
  Bottom Layer w0.508: IC1.15 67.92,70.891 R9.2@68.737,71.709
TX1: U3.2 | length 28.1
  Top Layer w0.432: v2(9.881,71.196) 9.886,71.191 10.891,71.191 10.915,71.215 U3.2
  Top Layer w0.508: v2(5.156,52.146) 5.164,52.138 5.164,51.232 6.765,49.632 8.661,49.632
  Bottom Layer w0.508: v2(5.156,52.146) 5.156,66.472 v2(9.881,71.196)
TXD: C7.2 LED2.2 U2.2 U3.30 | length 152.8
  Top Layer w0.432: v2@14.802,72.117 U3.30
  Top Layer w0.508: v2(11.608,61.57) 17.221,55.956 41.707,55.956 49.187,63.436 v2(82.728,63.436) ; v2@14.802,72.117 v2(14.808,72.111)
  Bottom Layer w0.432: v2(71.577,22.946) 71.594,22.946 72.926,21.614 72.926,20.581 U2.2
  Bottom Layer w0.508: v2(11.608,61.57) 11.608,65.215 14.834,68.44 14.834,72.085 v2(14.808,72.111) ; v2(71.577,22.946) 70.394,24.13 64.491,24.13 63.703,24.917 63.703,39.37 82.728,58.395 v2(82.728,63.436) C7.2
pads on no net: IC1.1 IC1.3 IC1.4 U2.4 U2.9 U2.10 U2.11 U2.12 U2.14 U2.15 U3.19 U3.22 U4.7 U4.11 U4.12
copper on no net: | length 9.4
  Bottom Layer w0.432: v2(62.484,21.412) 63.297,22.225 67.564,22.225 69.468,22.225 70.409,21.284 70.409,20.559

## Polygon pours and split planes (outlines as drawn)
GND on Bottom Layer "GND_L02_P035" (solid, pour order 35): 92.3,87.6 92.3,0 0,0 0,87.6
A+ on Bottom Layer "A+_L02_P025" (solid, pour order 25): 57.025,57.582 ccw(c57.025,57.149) 56.718,57.455 47.168,47.904 47.168,17.196 35.065,5.093 ccw(c38.214,2.436) 34.646,4.496 ccw(c35.944,3.976) 34.798,3.175 ccw(c35.975,4.196) 35.865,2.642 ccw(c36.03,4.082) 36.932,2.946 50.19,16.205 50.19,45.72 59.36,54.889 59.36,56.998 ccw(c58.776,56.998) 58.776,57.582
B- on Bottom Layer "B-_L02_P023" (solid, pour order 23): 57.46,50.724 ccw(c57.46,49.423) 56.54,50.343 51.765,45.568 51.765,16.84 39.954,5.029 ccw(c41.245,3.816) 39.474,3.761 ccw(c40.512,3.729) 39.756,3.018 39.853,2.921 ccw(c40.838,3.914) 40.843,2.515 41.097,2.515 ccw(c40.52,4.456) 41.796,2.883 54.229,15.316 54.229,41.25 59.728,46.749 59.728,50.127 ccw(c59.131,50.127) 59.131,50.724
+3.3V on Bottom Layer "+3.3V_L02_P034" (solid, pour order 34): 5.893,12.624 7.722,10.795 cw(c7.599,10.672) 7.772,10.672 7.772,10.668 cw(c7.404,10.668) 7.665,10.408 7.423,10.166 cw(c7.163,10.426) 7.163,10.058 7.144,10.058 cw(c7.144,10.319) 6.96,10.135 5.156,11.938
+12V on Bottom Layer "+12V_L02_P028" (solid, pour order 28): 38.583,36.093 38.176,36.093 ccw(c38.176,35.154) 37.236,35.154 37.236,17.348 24.935,5.046 ccw(c26.019,3.962) 24.486,3.962 ccw(c25.651,3.962) 24.827,3.139 24.867,3.099 ccw(c25.786,4.019) 25.786,2.718 25.883,2.718 ccw(c25.883,4.312) 27.01,3.185 40.665,16.84 40.665,35.357 ccw(c39.923,35.357) 39.923,36.099
"LED OUT" on Bottom Layer "LED_OUT_L02_P010" (solid, pour order 10): 46.99,3.15 46.895,3.055 cw(c45.898,4.052) 45.898,2.642 cw(c45.952,3.921) 45.009,3.055 cw(c45.761,3.887) 44.641,3.83 cw(c46.191,3.892) 45.136,5.029 55.27,15.164 55.27,18.491 cw(c55.728,18.491) 55.728,18.948 56.642,18.948 cw(c56.642,18.517) 57.074,18.517 57.074,13.233
+12V on Top Layer "+12V_L01_P001" (solid, pour order 1): 9.296,17.729 9.296,14.503 ccw(c9.627,14.503) 9.627,14.173 11.303,14.173 ccw(c11.303,14.453) 11.582,14.453 11.582,17.729
B- on Top Layer "B-_L01_P016" (solid, pour order 16): 87.478,49.098 ccw(c85.827,49.098) 85.827,50.749 57.404,50.749 ccw(c57.404,49.784) 56.439,49.784 56.439,47.422 ccw(c57.353,47.422) 57.353,46.507 85.776,46.507 ccw(c85.776,48.209) 87.478,48.209
+12V on Top Layer "+12V_L01_P029" (solid, pour order 29): 17.551,5.664 17.983,5.232 17.983,2.896 18.669,2.21 23.393,2.21 24.155,2.972 24.155,5.258 24.562,5.664 27.33,5.664 27.762,5.232 27.762,0.965 27.203,0.406 14.656,0.406 14.097,0.965 14.097,5.232 14.529,5.664
A+ on Top Layer "A+_L01_P015" (solid, pour order 15): 87.274,55.931 ccw(c85.623,55.931) 85.623,57.582 57.201,57.582 ccw(c57.201,56.617) 56.236,56.617 56.236,54.331 ccw(c57.226,54.331) 57.226,53.34 85.573,53.34 ccw(c85.573,55.042) 87.274,55.042
"LED OUT" on Top Layer "LED_OUT_L01_P004" (solid, pour order 4): 55.728,22.301 ccw(c55.728,21.844) 55.27,21.844 55.27,17.653 ccw(c55.829,17.653) 55.829,17.094 56.617,17.094 ccw(c56.617,17.551) 57.074,17.551 57.074,21.844 ccw(c56.617,21.844) 56.617,22.301
+12V on Top Layer "+12V_L01_P002" (solid, pour order 2): 59.614,36.119 38.227,36.119 ccw(c38.227,35.128) 37.236,35.128 37.236,27.737 ccw(c38.29,27.673) 38.227,26.619 58.293,26.619 ccw(c58.164,28.094) 59.639,28.219

## Keep-outs
Keep-Out Layer:
  the board outline again, w0.254

## Silkscreen, mask and mechanical layers (free items; w line width, h text height)
Top Overlay:
  text "PC2" at 79.722,74.651 h1.52 r270
  text "PC1" at 82.211,74.651 h1.52 r270
  text "GND" at 84.904,74.651 h1.52 r270
  text "RS" at 29.405,68.428 h1.52 r270
  text "NS" at 31.97,68.428 h1.52 r270
  text "SC" at 34.586,68.428 h1.52 r270
  text "MO" at 37.228,68.428 h1.52 r270
  text "MI" at 39.649,68.428 h1.52 r270
  text "RXD" at 79.604,66.726 h1.52 r270
  text "TXD" at 82.321,66.726 h1.52 r270
  text "GND" at 84.878,66.726 h1.52 r270
  text "RS485" at 46.533,42.437 h4
  text "PD3" at 6.833,1.363 h1.52

## Text inside footprints (layer, text, board x,y; h text height)
C1: Top Overlay "+" at 39.023,30.318 h0.89 r180
C2: Top Overlay "+" at 3.826,32.268 h0.89
U1: Top Overlay "1" at 16.488,20.625 h1